# Allegro board SUB_RTL8211_GPHY_V1_0_0427-1542.brd
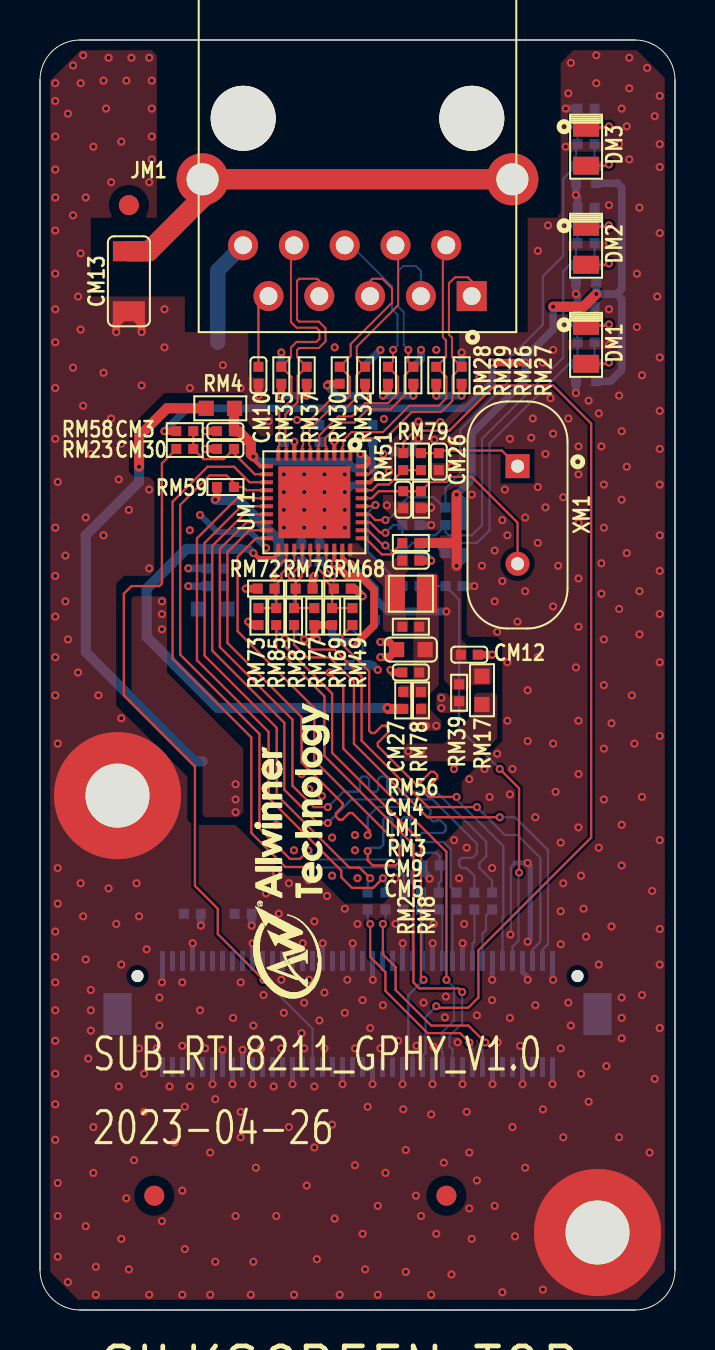
[diagram p0: board, top side]
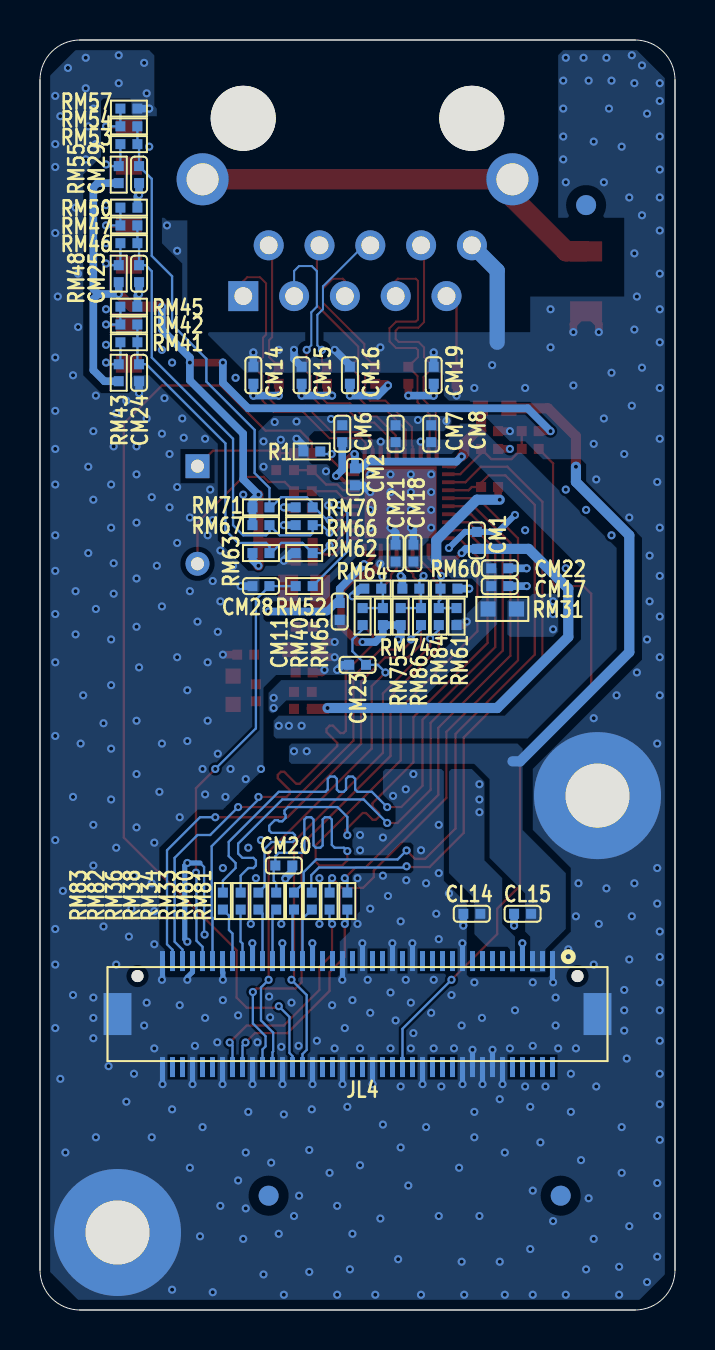
[diagram p1: board, bottom side, seen from below]

Outline 31.75 x 63.5 mm; copper layers: TOP, GND02, GND03, BOTTOM. Coordinates in mm from the lower left corner of the outline.
Outline path: 0,61.5 0,2 ; 0,61.5 arc(0.59,62.91) 2,63.5 ; 0,61.5 0,2 ; 0,2 arc(0.59,0.59) 2,0 ; 2,63.5 29.75,63.5 ; 2,63.5 29.75,63.5 ; 29.75,63.5 arc(31.16,62.91) 31.75,61.5 ; 2,0 29.75,0 ; 2,0 29.75,0 ; 29.75,0 arc(31.16,0.59) 31.75,2 ; 31.75,61.5 31.75,2 ; 31.75,61.5 31.75,2

## Design rules (mm)
net group 8211-XTAL-OUT: nets 8211-XTAL-OUT RGMII-25M
net group CLKOUT-125M: nets CLKOUT-125M RGMII-CLKIN-125M
net group MDC: nets MDC RGMII-MDC
net group MDIO: nets MDIO RGMII-MDIO
net group RGMII-RXCK: nets RGMII-RXCK RXC/PHYAD1
net group RGMII-RXCTL: nets RGMII-RXCTL RXCTL/PHYAD2
net group RGMII-RXD0: nets RGMII-RXD0 RXD0/RXDLY
net group RGMII-RXD1: nets RGMII-RXD1 RXD1/TXDLY
net group RGMII-RXD2: nets RGMII-RXD2 RXD2/PLLOFF
net group RGMII-RXD3: nets RGMII-RXD3 RXD3/PHYAD0
net group RGMII-TXCK: nets RGMII-TXCK TXC
net group RGMII-TXCTL: nets RGMII-TXCTL TXCTL
net group RGMII-TXD0: nets RGMII-TXD0 TXD0
net group RGMII-TXD1: nets RGMII-TXD1 TXD1
net group RGMII-TXD2: nets RGMII-TXD2 TXD2
net group RGMII-TXD3: nets RGMII-TXD3 TXD3
net group AVDD10: nets AVDD10 DVDD10 N15943518
net group DVDD33: nets DVDD33 INTB LED0/CFG-EXT LED1/CFG-LDO0 LED2/CFG-LDO1 N15939570 N15939594 N15939752 RGMII-PHYRSTB RGMII-RST
net group MDI0+: nets MDI0+ MDI0- N15993536

## Placement (name value [footprint] x y rotation side)
CL14  100nF  [C0402]  10.16 19.81 0 bottom
CL15  100nF  [C0402]  7.62 19.81 0 bottom
CM1  104-16V  [C0402]  9.91 38.48 90 bottom
CM2  104-16V  [C0402]  16 41.66 90 bottom
CM3  104-16V  [C0402]  9.27 43.94 0 top
CM4  NC/104-16V  [C0402]  18.54 37.47 180 top
CM5  104-16V  [C0402]  18.54 31.88 0 top
CM6  104-16V  [C0402]  16.64 43.81 90 bottom
CM7  104-16V  [C0402]  13.97 43.81 90 bottom
CM8  104-16V  [C0402]  12.19 43.81 90 bottom
CM9  10uF-16V  [C0603]  18.54 33.02 0 top
CM10  104-16V  [C0402]  10.92 46.74 90 top
CM11  104-16V  [C0402]  16.76 34.92 90 bottom
CM12  104-16V  [C0402]  21.46 32.77 180 top
CM13  1000pF-2KV  [C1206]  4.45 51.44 90 top
CM14  NC/102  [C0402]  21.08 46.74 90 bottom
CM15  NC/102  [C0402]  18.67 46.74 90 bottom
CM16  NC/102  [C0402]  16.26 46.74 90 bottom
CM17  0.1uF-6.3V  [C0402]  8.76 36.2 0 bottom
CM18  4.7uF-6.3V  [C0402]  13.08 37.85 270 bottom
CM19  NC/102  [C0402]  12.06 46.74 90 bottom
CM20  NC/22pF-16V  [C0402]  19.56 22.23 0 bottom
CM21  NC/104-16V  [C0402]  13.97 37.85 270 bottom
CM22  NC/4.7uF-16V  [C0402]  8.76 37.08 0 bottom
CM23  NC/22pF-16V  [C0402]  15.88 32.26 0 bottom
CM24  NC/100pF-16V  [C0402]  26.8 46.86 90 bottom
CM25  NC/100pF-16V  [C0402]  26.8 51.82 90 bottom
CM26  20pF-16V  [C0402]  19.94 42.42 270 top
CM27  20pF-16V  [C0402]  18.16 40.51 270 top
CM28  NC/22pF-16V  [C0402]  20.7 36.2 0 bottom
CM29  NC/100pF-16V  [C0402]  26.8 56.77 90 bottom
CM30  104-16V  [C0402]  9.27 43.05 180 top
DM1  POWER  [LED0805]  27.3 48.26 90 top
DM2  POWER  [LED0805]  27.3 53.21 90 top
DM3  POWER  [LED0805]  27.3 58.17 90 top
H4  NC-HOLE  [MTH635D320]  27.87 3.88 0 top
H14  NC-HOLE  [MTH635D320]  3.88 25.72 0 top
JL4  DF17(2.5)-80DP-0.5V  [SKT2_40P50B570_2500H350]  15.88 14.8 0 bottom
JM1  HFJ11-1G01E  [RJ12P127B1588_2159H1364]  15.88 59.69 180 top
LM1  2.2uH/1A DCR<0.1R  [LP160_200H100]  18.54 35.81 0 top
NOREF  -  [unnamed]  20.32 5.71 0 top
NOREF#2  -  [#2]  84.45 -63.5 0 top
NOREF#3  -  [#2]  -40.64 -80.52 0 top
NOREF#4  -  [#2]  14.86 15.49 90 top
NOREF#5  -  [unnamed]  4.45 55.24 0 top
NOREF#6  -  [unnamed]  5.71 5.71 0 top
NOREF#7  -  [#2]  2 0 90 top
NOREF#8  -  [#2]  0 61.5 0 top
NOREF#9  -  [unnamed]  5.71 5.71 180 bottom
NOREF#10  -  [unnamed]  4.45 55.24 180 bottom
NOREF#11  -  [unnamed]  20.32 5.71 180 bottom
R1  2K49-1%  [R0402]  18.16 42.93 0 bottom
RM2  0R  [R0402]  18.16 30.48 90 top
RM3  NC/0R  [R0402]  18.54 34.16 180 top
RM4  0R  [R0603]  9.02 45.09 180 top
RM8  0R  [R0402]  19.05 30.48 90 top
RM17  0R  [R0603]  22.1 30.99 270 top
RM23  0R  [R0402]  7.24 43.05 180 top
RM26  NC/49R9-1%  [R0402]  19.81 46.74 90 top
RM27  NC/49R9-1%  [R0402]  21.08 46.74 90 top
RM28  NC/49R9-1%  [R0402]  17.4 46.74 90 top
RM29  NC/49R9-1%  [R0402]  18.67 46.74 90 top
RM30  NC/49R9-1%  [R0402]  14.99 46.74 90 top
RM31  0R  [R0603]  8.64 35.05 180 bottom
RM32  NC/49R9-1%  [R0402]  16.26 46.74 90 top
RM33  0R  [R0402]  18.16 20.45 270 bottom
RM34  0R  [R0402]  19.05 20.45 270 bottom
RM35  NC/49R9-1%  [R0402]  12.06 46.74 90 top
RM36  0R  [R0402]  20.83 20.45 270 bottom
RM37  NC/49R9-1%  [R0402]  13.34 46.74 90 top
RM38  0R  [R0402]  19.94 20.45 270 bottom
RM39  NC/0R  [R0402]  20.95 30.86 270 top
RM40  0R  [R0402]  15.62 34.67 270 bottom
RM41  NC/0R  [R0402]  27.3 48.39 180 bottom
RM42  0R  [R0402]  27.3 49.28 180 bottom
RM43  510R  [R0402]  27.81 46.86 90 bottom
RM45  NC/510R  [R0402]  27.3 50.16 180 bottom
RM46  0R  [R0402]  27.3 53.34 180 bottom
RM47  NC/0R  [R0402]  27.3 54.23 180 bottom
RM48  NC/510R  [R0402]  27.81 51.82 90 bottom
RM49  0R  [R0402]  15.62 34.67 270 top
RM50  510R  [R0402]  27.3 55.12 180 bottom
RM51  0R  [R0402]  18.16 42.42 90 top
RM52  0R  [R0402]  18.54 36.2 0 bottom
RM53  NC/0R  [R0402]  27.3 58.29 180 bottom
RM54  0R  [R0402]  27.3 59.18 180 bottom
RM55  510R  [R0402]  27.81 56.77 90 bottom
RM56  4K7  [R0402]  18.54 38.35 0 top
RM57  NC/510R  [R0402]  27.3 60.07 180 bottom
RM58  4K7  [R0402]  7.24 43.94 180 top
RM59  1K5  [R0402]  9.27 41.15 180 top
RM60  NC/4K7  [R0402]  11.3 36.07 180 bottom
RM61  4K7  [R0402]  10.92 34.67 90 bottom
RM62  NC/4K7  [R0402]  18.54 37.85 0 bottom
RM63  4K7  [R0402]  20.7 37.85 180 bottom
RM64  4K7  [R0402]  15.11 36.07 0 bottom
RM65  NC/4K7  [R0402]  14.61 34.67 90 bottom
RM66  4K7  [R0402]  18.54 39.24 0 bottom
RM67  NC/4K7  [R0402]  20.7 39.24 180 bottom
RM68  4K7  [R0402]  15.11 36.07 0 top
RM69  NC/4K7  [R0402]  14.61 34.67 90 top
RM70  4K7  [R0402]  18.54 40.13 0 bottom
RM71  NC/4K7  [R0402]  20.7 40.13 180 bottom
RM72  4K7  [R0402]  11.3 36.07 180 top
RM73  NC/4K7  [R0402]  10.92 34.67 90 top
RM74  4K7  [R0402]  13.21 36.07 0 bottom
RM75  NC/4K7  [R0402]  13.72 34.67 90 bottom
RM76  NC/4K7  [R0402]  13.21 36.07 0 top
RM77  4K7  [R0402]  13.72 34.67 90 top
RM78  0R  [R0402]  19.05 40.51 270 top
RM79  NC/0R  [R0402]  19.05 42.42 90 top
RM80  0R  [R0402]  17.27 20.45 270 bottom
RM81  0R  [R0402]  16.38 20.45 270 bottom
RM82  0R  [R0402]  21.72 20.45 270 bottom
RM83  0R  [R0402]  22.61 20.45 270 bottom
RM84  0R  [R0402]  11.81 34.67 270 bottom
RM85  0R  [R0402]  11.81 34.67 270 top
RM86  0R  [R0402]  12.7 34.67 270 bottom
RM87  0R  [R0402]  12.7 34.67 270 top
UM1  RTL8211F-CG  [QFN41P40B500_500H85]  13.72 40.39 270 top
XM1  25MHZ/49US1  [X2B500_1135H350]  23.88 39.75 270 top

## Library data of the parts
CL14 CL15 = CAPACITOR_0: room: LVDS
CM1 CM6-CM8 CM10 CM20 CM23 CM26-CM28 CM30 = C-C0402: room: EMMC
CM2-CM4 CM11 CM12 CM17 CM18 CM21 CM22 CM24 CM25 CM29 = CAP_2: room: EMAC
CM5 CM9 = CAPACITOR_0
CM13 = C-C1206
CM14-CM16 CM19 = C-C0402: signal model: C-C0402_C0402; room: EMMC
DM1-DM3 = LED-0805
H4 H14 = HOLE
JL4 = DF17-3.0-80DS-0.5V
JM1 = HFJ11-1G01E
LM1 = L-LP2_00X1_60H1_00
R1 RM4 RM17 RM31 RM39 RM59 = R
RM2 RM8 RM23 RM33 RM34 RM36 RM38 RM40 RM42 RM46 RM49 RM51 RM52 RM54 RM78 RM80-RM87 = R-R0402: signal model: R-R0402_6; room: EMMC
RM3 RM41 RM43 RM45 RM47 RM48 RM50 RM53 RM55 RM57 RM79 = R-R0402: room: EMMC
RM26-RM30 RM32 RM35 RM37 = R-R0402: signal model: R-R0402_R0402; room: EMMC
RM56 RM58 RM61 RM63 RM64 RM66 RM68 RM70 RM72 RM74 RM77 = R: signal model: R_R0402_4
RM60 RM62 RM65 RM67 RM69 RM71 RM73 RM75 RM76 = R: signal model: R_R0402_N
UM1 = RTL8169s_1
XM1 = XM/SM_0

## Footprints (pads in the part's own frame, mm; a bottom-side part is the same pattern mirrored in y, then rotated)
C0402
  rect 0.5x0.5 smd: 1(-0.425,0) 2(0.425,0)
C0603
  rect 0.76x0.76 smd: 1(-0.71,0) 2(0.71,0)
C1206
  rect 1x1.6 smd: 1(-1.5,0) 2(1.5,0)
LED0805
  rect 0.9x1.3 smd: 1(-0.95,0) 2(0.95,0)
LP160_200H100
  rect 1x1.9 smd: 1(-0.8,0) 2(0.8,0)
MTH635D320
  round 6.35 hole 3.2: 1(0,0)
QFN41P40B500_500H85
  rect 0.63x0.2 smd: 1(-2.385,1.8) 2(-2.385,1.4) 3(-2.385,1) 4(-2.385,0.6) 5(-2.385,0.2) 6(-2.385,-0.2) 7(-2.385,-0.6) 8(-2.385,-1) 9(-2.385,-1.4) 10(-2.385,-1.8) 21(2.385,-1.8) 22(2.385,-1.4) 23(2.385,-1) 24(2.385,-0.6) 25(2.385,-0.2) 26(2.385,0.2) 27(2.385,0.6) 28(2.385,1) 29(2.385,1.4) 30(2.385,1.8)
  rect 0.2x0.63 smd: 11(-1.8,-2.385) 12(-1.4,-2.385) 13(-1,-2.385) 14(-0.6,-2.385) 15(-0.2,-2.385) 16(0.2,-2.385) 17(0.6,-2.385) 18(1,-2.385) 19(1.4,-2.385) 20(1.8,-2.385) 31(1.8,2.385) 32(1.4,2.385) 33(1,2.385) 34(0.6,2.385) 35(0.2,2.385) 36(-0.2,2.385) 37(-0.6,2.385) 38(-1,2.385) 39(-1.4,2.385) 40(-1.8,2.385)
  rect 3.6x3.6 smd: 41(0,0)
R0402
  rect 0.5x0.5 smd: 1(-0.425,0) 2(0.425,0)
R0603
  rect 0.76x0.76 smd: 1(-0.71,0) 2(0.71,0)
RJ12P127B1588_2159H1364
  round 3.25 hole 3.25 unplated: (-5.715,0.105) (5.715,0.105)
  rect 1.5x1.5 hole 0.89: 1(-5.71,8.995)
  round 1.5 hole 0.89: 2(-4.44,6.455) 3(-3.17,8.995) 4(-1.9,6.455) 5(-0.63,8.995) 6(0.64,6.455) 7(1.91,8.995) 8(3.18,6.455) 9(4.45,8.995) 10(5.72,6.455)
  round 2.6 hole 1.6: 11(-7.745,3.155) 12(7.745,3.155)
SKT2_40P50B570_2500H350
  round 0.6 hole 0.6 unplated: (-11,-1.9) (11,-1.9)
  rect 0.25x1 smd: 1(-9.75,-2.65) 2(-9.75,2.65) 3(-9.25,-2.65) 4(-9.25,2.65) 5(-8.75,-2.65) 6(-8.75,2.65) 7(-8.25,-2.65) 8(-8.25,2.65) 9(-7.75,-2.65) 10(-7.75,2.65) 11(-7.25,-2.65) 12(-7.25,2.65) 13(-6.75,-2.65) 14(-6.75,2.65) 15(-6.25,-2.65) 16(-6.25,2.65) 17(-5.75,-2.65) 18(-5.75,2.65) 19(-5.25,-2.65) 20(-5.25,2.65) 21(-4.75,-2.65) 22(-4.75,2.65) 23(-4.25,-2.65) 24(-4.25,2.65) 25(-3.75,-2.65) 26(-3.75,2.65) 27(-3.25,-2.65) 28(-3.25,2.65) 29(-2.75,-2.65) 30(-2.75,2.65) 31(-2.25,-2.65) 32(-2.25,2.65) 33(-1.75,-2.65) 34(-1.75,2.65) 35(-1.25,-2.65) 36(-1.25,2.65) 37(-0.75,-2.65) 38(-0.75,2.65) 39(-0.25,-2.65) 40(-0.25,2.65) 41(0.25,-2.65) 42(0.25,2.65) 43(0.75,-2.65) 44(0.75,2.65) 45(1.25,-2.65) 46(1.25,2.65) 47(1.75,-2.65) 48(1.75,2.65) 49(2.25,-2.65) 50(2.25,2.65) 51(2.75,-2.65) 52(2.75,2.65) 53(3.25,-2.65) 54(3.25,2.65) 55(3.75,-2.65) 56(3.75,2.65) 57(4.25,-2.65) 58(4.25,2.65) 59(4.75,-2.65) 60(4.75,2.65) 61(5.25,-2.65) 62(5.25,2.65) 63(5.75,-2.65) 64(5.75,2.65) 65(6.25,-2.65) 66(6.25,2.65) 67(6.75,-2.65) 68(6.75,2.65) 69(7.25,-2.65) 70(7.25,2.65) 71(7.75,-2.65) 72(7.75,2.65) 73(8.25,-2.65) 74(8.25,2.65) 75(8.75,-2.65) 76(8.75,2.65) 77(9.25,-2.65) 78(9.25,2.65) 79(9.75,-2.65) 80(9.75,2.65)
  rect 1.4x2.1 smd: 81(12,0) 82(-12,0)
unnamed
  round 1 smd: 1(0,0)
X2B500_1135H350
  rect 1.2x1.2 hole 0.65: 1(-2.44,0)
  round 1.2 hole 0.65: 2(2.44,0)

## Nets
AVDD10: CM6.1 CM7.1 CM8.1 RM8.1 UM1.3(AVDD10 3) UM1.8(AVDD10 8) UM1.38(AVDD10 38)
AVDD33: CM2.2 CM3.2 RM4.1 UM1.11(AVDD33 11) UM1.40(AVDD33 40)
DVDD10: CM1.1 RM2.1 UM1.21(DVDD10 21)
DVDD33: CM11.2 CM12.2 RM17.1 RM39.1 RM43.1 RM48.1 RM55.1 RM56.2 RM58.2 RM63.1 RM67.1 RM71.1 UM1.29(DVDD33 29)
DVDDRG: CM17.2 CM18.2 CM21.2 CM22.2 RM31.1 RM39.2 RM59.2 RM61.1 RM65.1 RM69.1 RM73.1 RM75.1 RM77.1 UM1.28(DVDD_RG)
GND: CL14.2 CL15.2 CM1.2 CM2.1 CM3.1 CM4.1 CM5.1 CM6.2 CM7.2 CM8.2 CM9.1 CM10.1 CM11.1 CM12.1 CM13.1 CM14.2 CM15.2 CM16.2 CM17.1 CM18.1 CM19.2 CM20.1 CM21.1 CM22.1 CM23.2 CM24.1 CM25.1 CM26.2 CM27.2 CM28.2 CM29.1 CM30.2 H4.1 H14.1 JL4.1(P1) JL4.7(P7) JL4.12(P12) JL4.14(P14) JL4.16(P16) JL4.18(P18) JL4.19(P19) JL4.20(P20) JL4.28(P28) JL4.29(P29) JL4.33(P33) JL4.38(P38) JL4.39(P39) JL4.43(P43) JL4.44(P44) JL4.49(P49) JL4.50(P50) JL4.55(P55) JL4.56(P56) JL4.61(P61) JL4.62(P62) JL4.67(P67) JL4.68(P68) JL4.73(P73) JL4.74(P74) JL4.79(P79) JL4.80(P80) JL4.81(GND0) JL4.82(GND1) JM1.10(GND) R1.2 RM45.2 RM50.2 RM57.2 RM60.2 RM62.2 RM64.2 RM66.2 RM68.2 RM70.2 RM72.2 RM74.2 RM76.2 RM78.2 UM1.41(EGND)
VCC-3V3-DEV: CL15.1 JL4.3(P3) JL4.5(P5) RM4.2 RM17.2
VCC-3V3-DEV-IO: CL14.1 JL4.9(P9) RM31.2
8211-XTAL-IN: CM27.1 RM78.1 UM1.36(XTAL_IN) XM1.2
8211-XTAL-OUT: RM51.1 RM79.1 UM1.37(XTAL_OUT/EXT_CLK)
CHASIS-GND: CM13.2 JM1.11(SHIELD-1) JM1.12(SHIELD-0)
CLKOUT-125M: RM52.1 UM1.35(CLKOUT)
INTB: RM56.1 UM1.31(INTB/PMEB)
LED0/CFG-EXT: CM24.2 RM41.2 RM42.2 RM62.1 RM63.2 UM1.32(LED0/CFG_EXT)
LED1/CFG-LDO0: CM25.2 RM46.2 RM47.2 RM66.1 RM67.2 UM1.33(LED1/CFG_LDO0)
LED2/CFG-LDO1: CM29.2 RM53.2 RM54.2 RM70.1 RM71.2 UM1.34(LED2/CFG_LDO1)
MDC: RM33.1 UM1.13(MDC)
MDI0+: JM1.1(TD0+) RM27.2 UM1.1(MDI[0]+)
MDI0-: JM1.2(TD0-) RM26.2 UM1.2(MDI[0]-)
MDI1+: JM1.3(TD1+) RM29.2 UM1.4(MDI[1]+)
MDI1-: JM1.6(TD1-) RM28.2 UM1.5(MDI[1]-)
MDI2+: JM1.4(TD2+) RM32.2 UM1.6(MDI[2]+)
MDI2-: JM1.5(TD2-) RM30.2 UM1.7(MDI[2]-)
MDI3+: JM1.7(TD3+) RM37.2 UM1.9(MDI[3]+)
MDI3-: JM1.8(TD3-) RM35.2 UM1.10(MDI[3]-)
MDIO: RM34.1 RM59.1 UM1.14(MDIO)
REGOUT: CM4.2 LM1.1 RM3.2 UM1.30(REG_OUT)
RGMII-25M: JL4.54(P54) RM51.2
RGMII-CLKIN-125M: CM28.1 JL4.71(P71) RM52.2
RGMII-MDC: JL4.51(P51) RM33.2
RGMII-MDIO: JL4.53(P53) RM34.2
RGMII-PHYRSTB: CM30.1 RM23.1 RM58.1 UM1.12(PHYRSTB)
RGMII-RST: JL4.32(P32) RM23.2
RGMII-RXCK: CM23.1 JL4.58(P58) RM40.2
RGMII-RXCTL: JL4.69(P69) RM49.2
RGMII-RXD0: JL4.77(P77) RM87.2
RGMII-RXD1: JL4.75(P75) RM86.2
RGMII-RXD2: JL4.60(P60) RM85.2
RGMII-RXD3: JL4.52(P52) RM84.2
RGMII-TXCK: JL4.57(P57) RM38.2
RGMII-TXCTL: JL4.59(P59) RM36.2
RGMII-TXD0: JL4.65(P65) RM83.2
RGMII-TXD1: JL4.63(P63) RM82.2
RGMII-TXD2: JL4.64(P64) RM81.2
RGMII-TXD3: JL4.66(P66) RM80.2
RSET: R1.1 UM1.39(RSET)
RXC/PHYAD1: RM40.1 RM64.1 RM65.2 UM1.27(RXC/PHYAD1)
RXCTL/PHYAD2: RM49.1 RM68.1 RM69.2 UM1.26(RXCTL/PHYAD2)
RXD0/RXDLY: RM76.1 RM77.2 RM87.1 UM1.25(RXD0/RXDLY)
RXD1/TXDLY: RM74.1 RM75.2 RM86.1 UM1.24(RXD1/TXDLY)
RXD2/PLLOFF: RM72.1 RM73.2 RM85.1 UM1.23(RXD2/PLLOFF)
RXD3/PHYAD0: RM60.1 RM61.2 RM84.1 UM1.22(RXD3/PHYAD0)
TXC: CM20.2 RM38.1 UM1.20(TXC)
TXCTL: RM36.1 UM1.19(TXCTL)
TXD0: RM83.1 UM1.18(TXD0)
TXD1: RM82.1 UM1.17(TXD1)
TXD2: RM81.1 UM1.16(TXD2)
TXD3: RM80.1 UM1.15(TXD3)
XTAL-OUT: CM26.1 RM79.2 XM1.1
N15939562: DM1.1(ANODE) RM41.1 RM43.2
N15939566: DM3.1(ANODE) RM53.1 RM55.2
N15939570: DM2.1(ANODE) RM46.1 RM48.2
N15939594: DM1.2(CATHODE) RM42.1 RM45.1
N15939682: DM2.2(CATHODE) RM47.1 RM50.1
N15939752: DM3.2(CATHODE) RM54.1 RM57.1
N15943518: CM5.2 CM9.2 LM1.2 RM2.2 RM3.1 RM8.2
N15990976: CM10.2 JM1.9(VCC)
N15993536: CM14.1 RM26.1 RM27.1
N15993596: CM15.1 RM28.1 RM29.1
N15993624: CM16.1 RM30.1 RM32.1
N15993644: CM19.1 RM35.1 RM37.1

Pads without a net: JL4 2 4 6 8 10 11 13 15 17 21 22 23 24 25 26 27 30 31 34 35 36 37 40 41 42 45 46 47 48 70 72 76 78; NOREF 1; NOREF#5 1; NOREF#6 1; NOREF#9 1; NOREF#10 1; NOREF#11 1

## Via types
v1: diameter 0.406, hole 0.203, TOP to BOTTOM, 553 vias

## Routing (per net, layer and track width the routed paths; a pad name or vN(x,y) marks a point on that pad's centre or on a via; arc(x,y) is an arc through that point)
AVDD10: length 4.1
  TOP w0.203: v1(16.94,41.71) 16.81,41.71 16.49,41.39 UM1.38 ; UM1.3 v1(14.72,43.42) ; UM1.8 v1(12.72,43.42)
  BOTTOM w0.381: CM6.1 16.64,42.01 v1(16.94,41.71)
  vias: v1(18.67,29.21) v1(19.3,29.21) v1(19.81,29.21)
AVDD33: length 11.3
  TOP w0.203: v1(10.67,42.67) 10.67,42.54 11.03,42.19 UM1.11 ; UM1.40 16.28,42.19 16.43,42.34 16.43,42.55 16.18,42.8 v1(16.03,42.8)
  TOP w0.508: RM4.1 9.7,45.05 CM3.2 9.93,43.94 10.54,43.33 10.54,42.8 v1(10.67,42.67)
  BOTTOM w0.381: v1(16.03,42.8) 16,42.77 CM2.2 15.7,42.08 15.37,42.42 10.93,42.42 10.67,42.67 v1(10.67,42.67)
DVDD10: length 24.6
  TOP w0.203: UM1.21 11.92,37.82 11.69,37.6 10.92,37.6 v1(10.67,37.85)
  TOP w0.508: v1(17.37,30.1) 17.42,30.06 RM2.1
  BOTTOM w0.381: CM1.1 10.46,38.06 v1(10.67,37.85)
  BOTTOM w0.508: CM1.1 7.32,38.06 5.33,36.07 5.33,33.66 8.89,30.1 v1(17.37,30.1)
DVDD33: length 63.2
  TOP w0.203: UM1.29 15.12,37.64 15.47,37.29 v1(15.54,37.29)
  TOP w0.381: v1(22.61,47.37) v1(24.26,47.37) ; RM58.2 v1(6.22,43.94)
  TOP w0.508: v1(27.81,50.8) 27.18,50.16 v1(25.65,50.16) ; v1(20.83,37.21) 20.83,38.35 ; 20.83,38.35 RM56.2 ; 20.83,38.35 v1(20.83,40.77)
  BOTTOM w0.381: RM63.1 21.13,37.51 v1(20.83,37.21) ; RM43.1 28.53,46.44 29.08,46.99 29.08,50.55 28.83,50.8 ; 28.83,50.8 v1(27.81,50.8) RM48.1 ; 28.83,50.8 29.08,51.05 29.08,56.13 28.87,56.34 RM55.1 ; v1(20.32,34.92) 17.4,34.92 16.97,35.35 CM11.2 16.76,36.07 v1(15.54,37.29) ; v1(22.61,47.37) 22.61,46.35 21.34,45.09 7.37,45.09 v1(6.22,43.94) ; v1(25.65,50.16) 25.65,49.02 24.26,47.62 v1(24.26,47.37) 24.26,46.48 21.59,43.81 21.59,41.53 v1(20.83,40.77) 21.13,40.47 RM71.1 RM67.1
DVDDRG: length 17.7
  TOP w0.203: UM1.28 14.72,37.33 v1(14.73,37.31)
  TOP w0.381: v1(13.84,33.53) 13.72,33.66 RM77.1 RM69.1 ; RM59.2 8.85,40.6 v1(8.76,40.51) ; v1(15.62,33.4) 15.88,33.4 16.7,34.23 16.7,36.01 16.01,36.71 15.34,36.71 v1(14.73,37.31) ; v1(10.41,34.42) 10.58,34.25 RM73.1
  BOTTOM w0.381: v1(13.84,33.53) 13.72,33.66 RM77.1 RM69.1 14.61,33.78 14.99,33.4 v1(15.62,33.4)
  BOTTOM w0.508: v1(8.76,40.51) 9.91,40.51 11.94,38.48 11.94,37.39
  vias: v1(20.07,30.61) v1(20.07,30.1)
GND: length 72.5
  TOP w0.381: v1(13.72,36.7) 13.63,36.62 RM76.2 ; v1(10.29,36.07) RM72.2 ; CM10.1 v1(10.92,45.72) ; RM68.2 15.75,36.07 v1(16.13,35.69) ; v1(17.53,32) 17.65,31.88 CM5.1 ; CM3.1 v1(8.26,43.94) ; RM78.2 19.51,40.09 v1(19.56,40.13) ; CM4.1 v1(19.56,37.47) ; CM30.2 v1(8.26,43.05) ; v1(5.08,48.9) 5.08,49.3 CM13.1 3.81,49.3 v1(3.81,48.9) ; v1(17.02,32.64) 17.45,32.64 CM9.1 17.45,33.4 v1(17.02,33.4) ; CM12.1 v1(22.61,32.77)
  BOTTOM w0.114: v1(23.52,18.77) 23.52,18.82 23.55,18.85 23.55,22.15 23.75,22.35
  BOTTOM w0.254: JL4.19 10.63,18.33 v1(10.63,18.34) ; JL4.73 24.12,16.9 24.38,16.64 v1(24.38,16.51) ; JL4.56 v1(19.63,11.29) ; v1(6.1,16.38) 6.12,16.41 JL4.1 ; v1(16.64,16.51) 16.63,16.52 JL4.43 ; JL4.55 19.63,18.33 v1(19.63,18.34) ; JL4.74 v1(24.12,11.29) ; JL4.49 18.12,18.33 v1(18.13,18.34) ; JL4.16 v1(9.63,11.29) ; JL4.14 v1(9.12,13.01) ; JL4.44 v1(16.63,11.29) ; JL4.18 v1(10.12,13.01) ; v1(25.65,16.51) 25.63,16.54 JL4.79 ; v1(24.38,18.41) 24.51,18.54 24.51,22.23 v1(24.38,22.35) 23.75,22.35 ; JL4.29 13.12,18.33 v1(13.13,18.34) ; JL4.20 v1(10.63,11.29) ; v1(15.63,18.34) 15.63,18.33 JL4.39 ; JL4.7 7.63,18.33 v1(7.63,18.34) ; JL4.28 v1(12.63,11.29) ; JL4.80 v1(25.63,11.29) ; JL4.38 v1(15.12,11.29) ; JL4.50 v1(18.12,11.29) ; JL4.33 14.12,18.33 v1(14.13,18.34) ; JL4.62 v1(21.12,11.29) ; JL4.61 21.12,18.33 v1(21.13,18.34) ; JL4.68 v1(22.63,11.29) ; v1(22.61,16.51) 22.61,16.87 22.63,16.89 JL4.67 ; JL4.12 v1(8.63,11.29)
  BOTTOM w0.305: v1(11.3,38.1) 10.5,38.91 CM1.2 8.85,38.91 v1(8,39.75)
  BOTTOM w0.381: RM50.2 26.88,55.67 v1(26.8,55.75) CM29.1 ; RM76.2 13.63,36.62 v1(13.72,36.7) ; v1(18.92,43.56) 18.59,43.22 R1.2 ; v1(19.56,37.47) 19.18,37.85 RM62.2 ; CL14.2 v1(10.58,19.22) ; CM18.1 13.08,38.99 v1(13.21,39.12) ; CM15.2 18.67,47.16 19.05,47.54 v1(19.05,48.01) ; RM70.2 v1(19.56,40.13) ; v1(10.29,36.07) RM72.2 ; CM23.2 16.64,32.26 v1(16.89,32) ; RM45.2 26.88,50.72 v1(26.8,50.8) CM25.1 ; CM20.1 19.13,21.94 19.48,21.59 v1(19.48,21.56) ; v1(15.24,40.89) 15.58,41.23 CM2.1 ; CM19.2 v1(12.06,47.88) ; RM68.2 15.75,36.07 v1(16.13,35.69) ; CM28.2 v1(21.72,36.2) ; CM22.1 v1(7.42,37.08) ; CM24.1 v1(26.8,45.85) ; v1(17.02,48.01) 16.26,47.24 CM16.2 ; CM21.1 13.97,38.86 v1(14.22,39.12) ; RM66.2 v1(19.56,39.24) ; CM17.1 v1(7.42,36.2) ; CM14.2 v1(21.08,47.88) ; RM57.2 v1(26.29,60.07) ; CL15.2 v1(8.04,19.22)
  BOTTOM w0.762: JM1.10 8.89,51.97 8.89,48.39
  vias: v1(0.76,61.34) v1(0.76,60.45) v1(0.76,58.67) v1(0.76,57.02) v1(0.76,55.63) v1(0.76,53.98) v1(0.76,51.82) v1(0.76,50.04) v1(0.76,48.39) v1(0.76,46.1) v1(0.76,43.56) v1(0.76,39.12) v1(0.76,36.7) v1(0.76,34.67) v1(0.76,32.64) v1(0.76,30.73) v1(0.76,18.92) v1(0.76,17.65) v1(0.76,16.38) v1(0.76,14.99) v1(0.76,13.46) v1(0.76,11.81) v1(0.76,10.29) v1(0.76,8.51) v1(0.89,41.4) v1(0.89,28.32) v1(0.89,22.1) v1(0.89,20.32) v1(0.89,6.35) v1(0.89,4.7) v1(0.89,2.67) v1(1.27,37.72) v1(1.27,35.43) v1(1.4,59.82) v1(1.4,33.53) v1(1.4,1.4) v1(1.65,62.23) v1(1.65,54.74) v1(1.65,47.12) v1(1.91,50.67) v1(1.91,31.88) v1(2.03,61.34) v1(2.03,52.83) v1(2.03,49.02) v1(2.03,21.34) v1(2.16,62.74) v1(2.16,45.21) v1(2.16,19.68) v1(2.29,55.63) v1(2.29,39.62) v1(2.29,17.53) v1(2.29,4.19) v1(2.41,12.57) v1(2.54,42.8) v1(2.54,16) v1(2.54,14.99) v1(2.54,13.97) v1(2.67,58.17) v1(2.67,9.14) v1(2.67,6.86) v1(2.79,2.16) v1(2.79,0.76) v1(2.92,30.73) v1(3.17,61.47) v1(3.17,46.86) v1(3.17,38.73) v1(3.3,60.07) v1(3.43,62.61) v1(3.43,21.08) v1(3.56,56.39) v1(3.56,44.58) v1(3.81,19.3) v1(3.94,41.53) v1(3.94,11.18) v1(4.06,58.42) v1(4.06,43.31) v1(4.06,29.59) v1(4.06,17.27) v1(4.06,3.56) v1(4.32,61.47) v1(4.32,5.59) v1(4.45,40.01) v1(4.45,2.03) v1(4.57,62.61) v1(4.7,7.49) v1(4.83,21.34) v1(4.95,19.68) v1(4.95,13.08) v1(5.08,46.23) v1(5.21,11.81) v1(5.21,9.91) v1(5.33,18.03) v1(5.46,62.61) v1(5.46,56.39) v1(5.46,41.02) v1(5.46,37.08) v1(5.46,0.76) v1(5.59,61.47) v1(5.59,60.07) v1(5.59,58.67) v1(5.59,57.53) v1(5.84,13.08) v1(5.97,15.62) v1(5.97,14.22) v1(6.1,4.45) v1(6.22,50.04) v1(6.22,48.13) v1(6.48,11.18) v1(6.73,8.38) v1(7.11,16.38) v1(7.11,13.21) v1(7.11,5.97) v1(7.11,0.76) v1(7.24,10.16) v1(7.24,3.05) v1(7.49,46.1) v1(7.49,38.99) v1(7.49,11.18) v1(8,14.99) v1(8.26,13.08) v1(8.51,7.87) v1(8.51,0.76) v1(8.76,10.54) v1(8.76,2.41) v1(9.14,47.24) v1(9.65,14.61) v1(9.78,4.7) v1(10.03,46.1) v1(10.03,16.38) v1(10.03,9.91) v1(10.03,8.64) v1(10.54,0.76) v1(10.67,14.22) v1(10.67,2.41) v1(10.79,7.11) v1(11.05,13.08) v1(11.18,15.75) v1(11.3,20.83) v1(11.43,44.45) v1(11.68,11.18) v1(11.81,24.26) v1(11.81,21.84) v1(11.81,18.54) v1(11.81,4.7) v1(11.94,19.81) v1(12.06,16.51) v1(12.06,13.08) v1(12.19,41.78) v1(12.19,40.89) v1(12.19,40.01) v1(12.19,39.12) v1(12.19,14.86) v1(12.45,21.34) v1(12.45,9.14) v1(12.7,22.99) v1(12.7,0.76) v1(12.85,44.5) v1(13.08,26.8) v1(13.08,13.84) v1(13.21,41.78) v1(13.21,40.89) v1(13.21,40.01) v1(13.21,15.37) v1(13.21,13.08) v1(13.34,6.22) v1(13.44,21.49) v1(13.46,26.04) v1(13.46,16.51) v1(13.72,19.43) v1(13.72,11.18) v1(13.72,8.13) v1(13.84,2.54) v1(13.97,14.48) v1(14.1,25.7) v1(14.22,41.78) v1(14.22,40.89) v1(14.22,40.01) v1(14.22,15.88) v1(14.22,13.08) v1(14.35,20.7) v1(14.61,23.62) v1(14.61,21.72) v1(14.61,9.27) v1(14.73,48.13) v1(14.73,4.57) v1(14.99,0.76) v1(15.24,41.78) v1(15.24,40.01) v1(15.24,39.12) v1(15.24,20.07) v1(15.24,14.86) v1(15.37,16.51) v1(15.75,23.75) v1(15.75,22.99) v1(15.75,13.08) v1(15.75,7.24) v1(15.88,21.59) v1(15.88,19.3) v1(16.13,15.49) v1(16.13,3.81) v1(16.26,2.03) v1(16.38,10.16) v1(16.51,14.1) v1(16.89,5.21) v1(16.89,0.76) v1(17.02,13.08) v1(17.14,15.24) v1(17.2,44.55) v1(17.34,40.23) v1(17.27,6.86) v1(17.45,41.94) v1(17.78,21.59) v1(17.78,19.3) v1(17.91,13.46) v1(18.16,10.03) v1(18.29,8) v1(18.29,1.91) v1(18.82,13.21) v1(18.8,5.71) v1(18.92,44.42) v1(19.05,4.7) v1(19.18,15.37) v1(19.56,9.78) v1(19.56,0.76) v1(19.71,43.51) v1(19.68,19.3) v1(19.68,13.16) v1(19.81,48.01) v1(19.81,3.81) v1(20.02,44.4) v1(20.24,14.63) v1(20.19,7.37) v1(20.29,15.67) v1(20.57,43.43) v1(20.57,42.16) v1(20.57,1.78) v1(20.7,27.05) v1(20.7,23.5) v1(20.88,13.39) v1(20.95,21.59) v1(21.21,19.3) v1(21.34,23.11) v1(21.34,9.91) v1(21.46,26.54) v1(21.46,7.87) v1(21.46,5.08) v1(21.59,40.77) v1(21.59,3.56) v1(21.84,14.73) v1(21.84,6.48) v1(21.97,46.61) v1(22.1,37.21) v1(22.23,27.05) v1(22.48,25.65) v1(22.61,22.1) v1(22.61,15.49) v1(22.73,37.97) v1(22.73,35.43) v1(22.73,5.21) v1(22.86,33.91) v1(22.86,27.81) v1(22.89,13.39) v1(23.11,39.5) v1(23.11,36.45) v1(23.11,0.89) v1(23.24,41.02) v1(23.37,38.73) v1(23.37,32.38) v1(23.37,29.46) v1(23.5,43.56) v1(23.5,25.78) v1(23.5,14.61) v1(23.62,27.05) v1(23.62,9.14) v1(23.75,3.68) v1(23.88,34.42) v1(24,13.21) v1(24.26,39.62) v1(24.26,35.94) v1(24.26,7.11) v1(24.38,30.99) v1(24.38,28.45) v1(24.64,44.58) v1(24.56,43.61) v1(24.77,24.64) v1(24.77,15.24) v1(24.89,52.96) v1(24.89,41.15) v1(24.89,38.35) v1(24.89,32.64) v1(25.15,47.37) v1(25.15,10.03) v1(25.15,1.02) v1(25.27,42.8) v1(25.27,40.13) v1(25.4,54.23) v1(25.53,45.59) v1(25.65,48.01) v1(25.65,43.81) v1(25.65,35.18) v1(25.65,28.32) v1(25.78,25.91) v1(25.91,37.21) v1(26.04,23.37) v1(26.04,19.94) v1(26.04,18.29) v1(26.04,13.08) v1(26.16,40.64) v1(26.16,21.34) v1(26.16,8.64) v1(26.29,58.17) v1(26.42,60.83) v1(26.42,44.58) v1(26.42,15.37) v1(26.54,62.36) v1(26.54,14.22) v1(26.8,32.13) v1(26.92,43.18) v1(26.92,41.78) v1(26.92,39.37) v1(26.92,36.58) v1(26.92,34.16) v1(26.92,29.46) v1(26.92,26.8) v1(26.92,24.13) v1(27.05,21.72) v1(27.05,11.81) v1(27.18,20.07) v1(27.3,18.67) v1(27.43,45.47) v1(27.43,10.41) v1(27.81,62.74) v1(27.81,61.34) v1(27.94,44.83) v1(27.94,23.11) v1(27.94,17.27) v1(28.07,43.18) v1(28.07,37.34) v1(28.07,35.81) v1(28.19,41.27) v1(28.19,39.12) v1(28.19,33.53) v1(28.19,31.24) v1(28.19,28.07) v1(28.19,25.53) v1(28.32,12.19) v1(28.45,55.24) v1(28.45,53.34) v1(28.45,50.04) v1(28.45,48.26) v1(28.57,29.34) v1(28.57,19.18) v1(28.96,58.29) v1(28.96,45.72) v1(28.96,35.05) v1(28.96,8.64) v1(29.08,60.07) v1(29.08,43.94) v1(29.08,40.51) v1(29.08,24.26) v1(29.08,22.23) v1(29.08,15.62) v1(29.08,14.61) v1(29.08,13.59) v1(29.34,59.18) v1(29.34,42.16) v1(29.34,37.85) v1(29.46,62.61) v1(29.46,61.09) v1(29.46,57.53) v1(29.59,30.73) v1(29.72,28.32) v1(29.84,51.82) v1(29.84,49.15) v1(29.97,55.12) v1(29.97,35.94) v1(29.97,33.78) v1(30.1,46.74) v1(30.1,25.65) v1(30.1,15.75) v1(30.35,62.1) v1(30.48,7.87) v1(30.61,20.95) v1(30.73,59.69) v1(30.73,11.56) v1(30.86,50.67) v1(30.99,60.71) v1(30.99,58.29) v1(30.99,57.15) v1(30.99,53.85) v1(30.99,47.62) v1(30.99,44.96) v1(30.99,43.05) v1(30.99,41.27) v1(30.99,38.73) v1(30.99,36.96) v1(30.99,34.8) v1(30.99,32.38) v1(30.99,28.7) v1(30.99,23.5) v1(30.99,19.05) v1(30.99,17.27) v1(30.99,14.1)
VCC-3V3-DEV: length 23.9
  TOP w0.508: v1(4.95,42.16) 4.95,43.69 6.35,45.09 RM4.2
  BOTTOM w0.508: v1(4.95,42.16) 4.95,41.4 2.29,38.73 2.29,32.89 7.75,27.43 8.13,27.43
  vias: v1(18.41,27.94) v1(19.05,27.94)
VCC-3V3-DEV-IO:
  vias: v1(6.1,35.43) v1(6.1,34.8) v1(6.1,34.04) v1(9.78,26.29) v1(9.78,25.53) v1(9.78,24.89)
8211-XTAL-IN: length 11.2
  TOP w0.114: XM1.2 23.88,39.37 21.59,41.66 20.57,41.66 20.32,41.4 19.51,41.4 RM78.1 CM27.1 16.93,40.94 16.58,40.59 UM1.36
8211-XTAL-OUT: length 3.4
  TOP w0.114: UM1.37 16.6,40.99 16.89,41.27 17.44,41.27 RM51.1 RM79.1
CHASIS-GND: length 21.2
  TOP w1.016: CM13.2 5.44,52.94 8.13,55.63 JM1.12 JM1.11
CLKOUT-125M: length 5.6
  TOP w0.114: v1(16.77,40.25) 16.75,40.25 16.69,40.19 UM1.35
  BOTTOM w0.114: v1(16.77,40.25) 16.38,39.86 16.38,37.93 RM52.1
INTB: length 2.6
  TOP w0.114: UM1.31 16.28,38.59 17.09,37.78 17.52,37.78 17.59,37.85 17.61,37.85 RM56.1
LED0/CFG-EXT: length 20.3
  TOP w0.114: UM1.32 16.4,38.99 17.16,38.23 v1(17.27,38.23)
  BOTTOM w0.114: v1(17.27,38.23) 17.65,37.85 RM62.1 18.63,38.35 19.68,38.35 20.19,37.85 RM63.2 20.28,38.18 20.45,38.35 21.84,38.35 22.48,38.99 22.48,43.33 26.43,47.29 CM24.2 26.88,47.37 RM41.2 RM42.2
LED1/CFG-LDO0: length 24.8
  TOP w0.114: UM1.33 16.49,39.39 17.02,38.86 v1(17.27,38.86)
  BOTTOM w0.114: RM47.2 RM46.2 26.8,53.26 CM25.2 26.46,52.24 26.16,51.94 26.16,47.63 22.1,43.56 22.1,39.24 21.59,38.73 20.45,38.73 20.28,38.91 RM67.2 19.77,38.73 18.23,38.73 18.12,38.85 RM66.1 17.67,39.24 17.55,39.13 17.54,39.13 v1(17.27,38.86)
LED2/CFG-LDO1: length 26.9
  TOP w0.114: v1(17.27,39.5) 16.76,39.5 16.47,39.79 UM1.34
  BOTTOM w0.114: RM54.2 RM53.2 26.8,58.21 CM29.2 26.16,56.56 26.16,52.7 25.15,51.69 25.15,49.28 23.43,47.56 23.43,46.42 21.02,44.01 21.02,41.85 20.28,41.1 RM71.2 20.19,40.13 19.68,40.64 18.41,40.64 18.12,40.34 RM70.1 18.03,40.13 17.4,39.5 v1(17.27,39.5)
MDC: length 33.3
  TOP w0.114: v1(13.42,22.18) 13.39,22.15 12.27,22.15 10.57,23.85 10.57,28.63 6.63,32.56 6.63,40.41 8.38,42.16 9.7,42.16 10.48,41.39 UM1.13
  BOTTOM w0.114: v1(13.42,22.18) 13.48,22.12 17.81,22.12 18.19,21.74 18.19,20.9 RM33.1
MDI0+: length 15
  TOP w0.102: UM1.1 15.52,43.16 15.47,43.21 15.47,43.36 15.7,43.59 17.27,43.59 18.59,44.91 20.07,44.91 20.62,45.47 20.62,46.7 RM27.2 20.6,47.64 20.6,48.62 20.45,48.77 20.45,51.33 20.75,51.64 21.39,51.64 21.58,51.44 JM1.1
MDI0-: length 14.9
  TOP w0.102: UM1.2 15.12,43.16 15.16,43.21 15.16,43.48 15.57,43.89 17.15,43.89 18.47,45.21 19.94,45.21 20.32,45.59 20.32,46.65 RM26.2 20.29,47.64 20.29,48.49 20.14,48.64 20.14,53.06 JM1.2
MDI1+: length 15
  TOP w0.102: v1(18.41,48.01) 18.41,47.41 RM29.2 18.21,46.7 18.21,45.72 17.53,45.03 16.38,45.03 15.72,44.37 15.04,44.37 14.27,43.61 14.27,43.21 14.32,43.16 UM1.4
  BOTTOM w0.102: JM1.3 19.04,51.95 18.8,52.2 18.16,52.2 17.91,51.94 17.91,50.16 18.19,49.89 18.19,48.23 v1(18.41,48.01)
MDI1-: length 14.9
  TOP w0.102: v1(17.65,48.01) 17.65,47.41 RM28.2 17.91,46.65 17.91,45.85 17.4,45.34 16.26,45.34 15.6,44.68 14.91,44.68 13.96,43.73 13.96,43.27 13.92,43.23 UM1.5
  BOTTOM w0.102: JM1.6 15.55,53.24 17.6,51.18 17.6,50.04 17.88,49.76 17.88,48.23 v1(17.65,48.01)
MDI2+: length 13.2
  TOP w0.102: JM1.4 17.91,53.1 17.91,50.24 15.84,48.17 15.84,47.58 RM32.2 15.8,46.7 15.8,45.59 15.37,45.16 14.6,45.16 13.46,44.02 13.46,43.23 13.52,43.18 UM1.6
MDI2-: length 13.1
  TOP w0.102: UM1.7 13.12,43.19 13.16,43.23 13.16,44.15 14.48,45.47 15.24,45.47 15.49,45.72 15.49,46.65 RM30.2 15.53,47.71 15.53,48.3 17.6,50.37 17.6,51.08 17.12,51.56 16.61,51.56 16.5,51.45 JM1.5
MDI3+: length 13.7
  TOP w0.102: JM1.7 13.96,51.46 13.86,51.56 12.95,51.56 12.85,51.46 12.85,49.52 12.95,49.42 13.94,49.42 14.27,49.09 14.27,48.43 13.94,48.1 12.95,48.1 12.85,48 12.85,47.64 RM37.2 12.88,46.7 12.88,45.39 12.27,44.78 12.27,43.23 12.32,43.18 UM1.9
MDI3-: length 13.5
  TOP w0.102: UM1.10 11.92,43.16 11.96,43.21 11.96,44.91 12.57,45.52 12.57,46.65 RM35.2 12.55,47.64 12.55,48.12 12.83,48.4 13.82,48.4 13.97,48.56 13.97,48.96 13.82,49.12 12.83,49.12 12.55,49.4 12.55,53.09 JM1.8
MDIO: length 33.3
  TOP w0.114: v1(13.42,22.98) 13,22.56 12.5,22.56 10.97,24.08 10.97,28.8 7.01,32.77 7.01,40.26 8.48,41.73 9.32,41.73 9.7,41.36 RM59.1 10.16,41.15 10.32,40.99 UM1.14
  BOTTOM w0.114: v1(13.42,22.98) 13.87,22.53 17.93,22.53 18.57,21.89 18.57,21.35 RM34.1
RGMII-25M: length 48.6
  TOP w0.114: RM51.2 18.16,43.38 18.75,43.97 20.47,43.97 22.73,46.23 25.65,46.23 27.56,44.32 27.56,23.62 21.92,17.98 21.92,15.62 21.41,15.11 19.89,15.11 v1(19.81,15.19)
  BOTTOM w0.114: v1(19.81,15.19) 19.28,14.66 19.28,12.85 19.12,12.7 JL4.54
RGMII-CLKIN-125M: length 21.7
  TOP w0.114: v1(23.95,21.87) 23.95,26.09 v1(22.99,27.05)
  BOTTOM w0.114: v1(22.99,27.05) 20.95,29.08 20.95,35.52 CM28.1 RM52.2 ; v1(23.95,21.87) 23.93,21.84 23.93,18.47 23.62,18.16 23.62,17.45 JL4.71
RGMII-MDC: length 2.8
  BOTTOM w0.114: RM33.2 18.63,19.56 JL4.51
RGMII-MDIO: length 2.6
  BOTTOM w0.114: JL4.53 19.12,19.95 RM34.2
RGMII-PHYRSTB: length 5.6
  TOP w0.114: RM58.1 RM23.1 8.17,42.55 9.19,42.55 CM30.1 9.7,42.83 10.74,41.79 UM1.12
RGMII-RST: length 36.7
  TOP w0.114: RM23.2 6.1,42.33 6.1,36.32 5.97,36.2 4.57,36.2 4.19,35.81 4.19,30.73 7.75,27.18 7.75,21.21 8.89,20.07 8.89,18.8 v1(11.18,16.51)
  BOTTOM w0.114: v1(11.18,16.51) 13.63,14.06 JL4.32
RGMII-RXCK: length 26.2
  TOP w0.114: v1(14.48,31.88) 15.16,31.19 15.16,28.07 20.32,22.91 v1(20.32,16.51)
  BOTTOM w0.114: RM40.2 15.62,34.04 16.13,33.53 16.13,32.94 CM23.1 14.86,32.26 v1(14.48,31.88) ; JL4.58 20.12,12.89 20.09,12.93 20.09,13.87 20.7,14.48 20.7,16.13 v1(20.32,16.51)
RGMII-RXCTL: length 24.4
  TOP w0.114: v1(20.83,25.65) 19.43,25.65 19.26,25.83 19.26,25.99 19.86,26.59 19.86,26.75 19.7,26.91 19.54,26.91 18.94,26.31 18.77,26.31 16.89,28.2 16.89,28.36 17.43,28.89 17.43,29.06 17.26,29.22 17.1,29.22 16.73,28.85 16.57,28.85 16.46,28.96 16.46,31.93 15.11,33.27 15.11,33.74 RM49.2
  BOTTOM w0.114: v1(20.83,25.65) 20.83,25.53 23.17,23.19 23.17,19.64 23.12,19.6 JL4.69
RGMII-RXD0: length 25.4
  TOP w0.114: RM87.2 12.7,33.27 13.35,32.63 14.49,32.63 15.7,31.42 15.7,28.31 19.37,24.64 v1(22.99,24.64)
  BOTTOM w0.114: JL4.77 25.12,18.01 25.4,18.29 25.4,22.99 23.75,24.64 v1(22.99,24.64)
RGMII-RXD1: length 24.5
  TOP w0.114: v1(21.84,25.15) 19.4,25.15 16.08,28.47 16.08,31.67 14.73,33.02 13.59,33.02 13.21,33.4 v1(13.21,33.53)
  BOTTOM w0.114: v1(13.21,33.53) 12.7,34.04 RM86.2 ; v1(21.84,25.15) 23.24,23.75 23.88,23.75 25.02,22.61 25.02,18.41 24.63,18.02 JL4.75
RGMII-RXD2: length 27.4
  TOP w0.114: RM85.2 11.81,33.1 14.22,30.68 14.22,27.7 18.67,23.26 18.67,16.38 18.97,16.08 20.93,16.08 v1(21.11,15.9)
  BOTTOM w0.114: JL4.60 20.63,13.03 20.47,13.18 20.47,13.69 21.11,14.33 v1(21.11,15.9)
RGMII-RXD3: length 25.6
  TOP w0.114: v1(19.18,16.51) 19.05,16.64 19.05,23.41 14.61,27.86 14.61,30.82 12.24,33.19 v1(12.24,33.58)
  BOTTOM w0.114: JL4.52 18.63,12.79 18.41,13 18.41,15.75 v1(19.18,16.51) ; RM84.2 11.81,34.01 v1(12.24,33.58)
RGMII-TXCK: length 2.7
  BOTTOM w0.114: JL4.57 20.12,19.84 RM38.2
RGMII-TXCTL: length 2.7
  BOTTOM w0.114: RM36.2 20.63,19.82 JL4.59
RGMII-TXD0: length 2.8
  BOTTOM w0.114: RM83.2 22.3,19.72 22.3,19 22.12,18.82 JL4.65
RGMII-TXD1: length 2.6
  BOTTOM w0.114: RM82.2 21.72,20.02 21.72,18.42 21.63,18.32 JL4.63
RGMII-TXD2: length 11
  TOP w0.114: v1(21.47,13.38) 21.01,13.84 19.38,13.84 17.27,15.95 17.27,16.89 16.51,17.65 v1(16.51,19.3)
  BOTTOM w0.114: RM81.2 16.38,19.43 v1(16.51,19.3) ; v1(21.47,13.38) 21.63,13.22 JL4.64
RGMII-TXD3: length 11.2
  TOP w0.114: v1(17.14,19.3) 17.14,17.78 17.78,17.14 17.78,16 19.56,14.22 21.42,14.22 v1(22.27,13.38)
  BOTTOM w0.114: v1(17.14,19.3) 17.27,19.43 RM80.2 ; v1(22.27,13.38) 22.12,13.23 JL4.66
RSET: length 2.3
  TOP w0.114: v1(17.17,42.8) 17.17,42.52 16.44,41.79 UM1.39
  BOTTOM w0.114: v1(17.17,42.8) 17.61,42.8 R1.1
RXC/PHYAD1: length 4.1
  TOP w0.114: v1(14.63,36.68) 14.63,36.7 14.32,37.02 UM1.27
  BOTTOM w0.114: RM40.1 RM65.2 14.61,35.98 RM64.1 14.69,36.62 v1(14.63,36.68)
RXCTL/PHYAD2: length 4.3
  TOP w0.114: UM1.26 13.92,37.06 14.2,36.78 14.2,36.56 RM68.1 14.61,35.98 RM69.2 RM49.1
RXD0/RXDLY: length 4.3
  TOP w0.114: RM77.2 RM87.1 12.78,35.18 RM76.1 12.78,36.37 13.09,36.67 13.09,36.79 13.48,37.19 13.48,37.2 13.52,37.24 UM1.25
RXD1/TXDLY: length 4.3
  TOP w0.114: UM1.24 13.12,37.34 12.57,36.8 v1(12.57,36.7)
  BOTTOM w0.114: v1(12.57,36.7) 12.78,36.49 RM74.1 12.7,35.98 RM86.1 RM75.2
RXD2/PLLOFF: length 4.2
  TOP w0.114: RM73.2 RM85.1 11.81,35.98 RM72.1 11.73,36.2 12.07,36.54 12.07,36.82 12.72,37.47 UM1.23
RXD3/PHYAD0: length 4.1
  TOP w0.114: UM1.22 12.32,37.59 11.68,36.96 v1(11.68,36.7)
  BOTTOM w0.114: v1(11.68,36.7) 11.73,36.66 RM60.1 11.73,35.52 11.81,35.43 RM84.1 RM61.2
TXC: length 34.1
  TOP w0.114: UM1.20 10.8,38.59 9.88,37.67 9.88,33.93 13.72,30.1 13.72,27.48 17.97,23.23 17.97,22.41 17.78,22.23 16.64,22.23 16.38,22.48 v1(16.38,22.95)
  BOTTOM w0.114: v1(16.38,22.95) 16.55,23.11 17.02,23.11 17.16,23.26 17.16,24.52 17.27,24.64 17.5,24.64 17.62,24.52 17.62,23.23 17.73,23.11 17.96,23.11 18.07,23.23 18.07,24.52 18.19,24.64 18.42,24.64 18.53,24.52 18.53,22.97 18.65,22.86 19.81,22.86 19.98,22.69 CM20.2 20.07,22.14 20.07,21.46 19.94,21.34 RM38.1
TXCTL: length 32.3
  TOP w0.114: UM1.19 10.46,38.99 9.37,37.9 9.37,33.35 13.08,29.64 13.08,27.38 15.13,25.33 15.13,25.17 14.79,24.84 14.79,24.68 14.96,24.51 15.12,24.51 15.45,24.85 15.61,24.85 16.47,23.99 16.47,23.83 v1(16.38,23.74)
  BOTTOM w0.114: RM36.1 20.52,21.18 20.52,23.05 20.17,23.4 19.11,23.4 19,23.51 19,23.74 19.11,23.86 20.17,23.86 20.29,23.97 20.29,24.21 20.01,24.49 19.85,24.49 19.8,24.44 19.63,24.44 19.47,24.6 19.47,24.76 19.53,24.81 19.53,24.97 19.35,25.15 16.88,25.15 16.38,24.65 v1(16.38,23.74)
TXD0: length 33.2
  TOP w0.114: v1(14.39,25.15) 13.69,25.15 12.62,26.21 12.62,29.51 8.99,33.15 8.99,38.05 10.33,39.39 UM1.18
  BOTTOM w0.114: v1(14.39,25.15) 15.15,25.91 15.88,25.91 15.99,26.02 15.99,26.56 16.11,26.67 16.33,26.67 16.45,26.56 16.45,26.02 16.56,25.91 16.79,25.91 16.91,26.02 16.91,26.56 17.02,26.67 17.25,26.67 17.36,26.56 17.36,26.02 17.48,25.91 19.81,25.91 22.31,23.41 22.31,22.69 21.97,22.35 21.97,22.1 22.61,21.46 RM83.1
TXD1: length 32.4
  TOP w0.114: v1(14.39,24.35) 13.87,24.35 12.22,26.01 12.22,29.36 8.61,32.97 8.61,38.2 10.2,39.79 UM1.17
  BOTTOM w0.114: RM82.1 21.72,21.72 21.34,22.1 21.08,22.1 20.95,22.23 20.95,22.48 21.08,22.61 21.63,22.61 21.84,22.82 21.84,23.32 19.63,25.53 15.57,25.53 v1(14.39,24.35)
TXD2: length 25.1
  TOP w0.114: v1(16.51,21.59) 15.98,22.12 15.47,22.12 11.84,25.76 11.84,29.11 8.23,32.72 8.23,38.35 10.06,40.19 UM1.16
  BOTTOM w0.114: v1(16.51,21.59) 16.38,21.46 RM81.1
TXD3: length 27.5
  TOP w0.114: UM1.15 9.85,40.59 7.85,38.58 7.85,32.49 11.43,28.91 11.43,25.6 15.06,21.97 15.06,21.64 15.6,21.11 16.66,21.11 v1(17.14,21.59)
  BOTTOM w0.114: RM80.1 17.27,21.46 v1(17.14,21.59)
XTAL-OUT: length 5.2
  TOP w0.114: RM79.2 CM26.1 20.07,42.97 23.1,42.97 XM1.1
N15939562: length 3
  TOP w0.114: DM1.1 28.39,47.31 v1(28.45,47.37)
  BOTTOM w0.114: RM41.1 27.73,47.37 RM43.2 28.36,47.29 v1(28.45,47.37)
N15939566: length 3
  TOP w0.114: v1(28.45,57.28) 28.39,57.22 DM3.1
  BOTTOM w0.114: v1(28.45,57.28) 28.36,57.19 RM55.2 27.73,57.28 RM53.1
N15939570: length 3
  TOP w0.114: v1(28.45,52.32) 28.39,52.26 DM2.1
  BOTTOM w0.114: RM46.1 27.73,52.32 RM48.2 28.36,52.24 v1(28.45,52.32)
N15939594: length 2.8
  TOP w0.114: DM1.2 28.25,49.21 28.32,49.28 v1(28.45,49.28)
  BOTTOM w0.114: v1(28.45,49.28) RM42.1 RM45.1
N15939682: length 2.8
  TOP w0.114: v1(28.45,54.23) 28.32,54.23 28.25,54.16 DM2.2
  BOTTOM w0.114: RM50.1 RM47.1 v1(28.45,54.23)
N15939752: length 2.8
  TOP w0.114: DM3.2 28.25,59.12 28.32,59.18 v1(28.45,59.18)
  BOTTOM w0.114: v1(28.45,59.18) RM54.1 RM57.1
N15990976: length 3.7
  TOP w0.114: JM1.9 10.92,50.19 CM10.2
N15993536: length 3
  TOP w0.381: RM26.1 v1(19.81,45.72) ; RM27.1 v1(21.08,45.72)
  BOTTOM w0.381: RM27.1 v1(21.08,45.72) v1(19.81,45.72)
N15993596: length 3.4
  TOP w0.381: RM28.1 17.4,45.97 v1(17.14,45.72) ; RM29.1 v1(18.67,45.72)
  BOTTOM w0.381: RM29.1 v1(18.67,45.72) v1(17.14,45.72)
N15993624: length 4
  TOP w0.381: RM30.1 14.43,46.31 v1(14.35,46.23) ; RM32.1 v1(16.26,45.72)
  BOTTOM w0.381: v1(14.35,46.23) 14.86,45.72 v1(16.26,45.72) RM32.1
N15993644: length 3
  TOP w0.381: RM37.1 v1(13.34,45.72) ; RM35.1 v1(12.06,45.72)
  BOTTOM w0.381: v1(13.34,45.72) v1(12.06,45.72) RM35.1

## Copper pours and planes (outline as drawn; the poured copper is in the pictures)
AVDD10 on TOP: 18.92,30.35 19.3,30.35 19.43,30.23 19.43,30.1 20.07,29.46 20.07,29.08 19.94,28.96 18.54,28.96 18.41,29.08 18.41,29.34 18.8,29.72 18.8,30.23
AVDD10 on BOTTOM: 16.76,43.69 11.68,43.69 11.05,44.32 9.91,44.32 8.45,42.86 7.68,42.86 2.92,38.1 2.92,33.02 7.37,28.57 19.94,28.57 20.07,28.7 20.07,29.46 19.81,29.72 8.51,29.72 4.7,33.53 4.7,37.08 10.67,43.05 10.92,43.05 11.18,42.8 15.62,42.8 15.88,43.05 16.76,43.05 16.89,43.18 16.89,43.56
DVDD33 on TOP: 20.19,31.5 20.19,37.47 19.94,37.72 19.94,38.61 20.07,38.73 20.95,38.73 21.08,38.61 21.08,33.53 21.34,33.27 21.34,32.38 21.46,32.26 22.48,32.26 22.61,32.13 22.61,31.37 22.48,31.24 21.59,31.24 21.34,30.99 20.7,30.99
DVDDRG on TOP: 21.21,30.73 21.34,30.61 21.34,29.97 21.21,29.84 19.94,29.84 19.81,29.97 19.81,30.73 19.94,30.86 20.32,30.86 20.45,30.73
DVDDRG on BOTTOM: 8.89,37.08 9.53,37.72 14.73,37.72 14.99,37.47 14.99,37.21 14.86,37.08 11.68,37.08 11.18,36.58 10.16,36.58 9.65,36.07 9.65,35.56 10.67,34.54 11.05,34.54 11.18,34.42 11.18,33.4 13.08,31.5 19.68,31.5 20.32,30.86 20.32,29.97 20.19,29.84 20.07,29.84 19.43,30.48 12.7,30.48 8.89,34.29
GND on TOP: 1.91,0.51 0.51,1.91 0.51,61.47 2.03,62.99 5.59,62.99 5.84,62.74 5.84,54.23 6.1,53.98 11.43,53.98 12.06,54.61 25.78,54.61 26.04,54.86 26.04,62.36 26.67,62.99 29.84,62.99 31.24,61.59 31.24,1.91 29.84,0.51 ; 2 cut-outs
GND on BOTTOM: 1.78,0.51 0.51,1.78 0.51,61.59 1.91,62.99 5.59,62.99 5.84,62.74 5.84,54.61 5.97,54.48 25.4,54.48 25.53,54.61 25.53,59.69 26.04,60.2 26.04,62.74 26.29,62.99 29.97,62.99 31.24,61.72 31.24,1.91 29.84,0.51 ; 1 cut-out
VCC-3V3-DEV on TOP: 22.86,30.73 22.86,28.57 21.72,27.43 18.29,27.43 18.16,27.56 18.16,28.19 18.29,28.32 20.19,28.32 21.72,29.84 21.72,30.73 21.84,30.86 22.73,30.86
VCC-3V3-DEV on BOTTOM: 7.24,16.89 6.48,16.89 6.48,18.03 5.46,19.05 5.46,21.84 7.62,24 7.62,28.07 7.87,28.32 19.18,28.32 19.3,28.19 19.3,27.43 19.18,27.3 10.03,27.3 9.27,26.54 9.27,22.61 7.49,20.83 7.49,18.92 7.24,18.67
VCC-3V3-DEV-IO on TOP: 6.22,35.69 4.7,35.69 4.57,35.56 4.57,30.99 8.13,27.43 8.13,24.77 8.26,24.64 9.91,24.64 10.16,24.89 10.16,28.07 6.35,31.88 6.35,35.56
VCC-3V3-DEV-IO on BOTTOM: 8.38,35.43 8.26,35.56 7.37,35.56 7.11,35.81 5.97,35.81 5.84,35.69 5.84,33.91 6.1,33.66 8.26,33.66 8.38,33.78
VCC-3V3-DEV-IO on BOTTOM: 8,16.89 8.26,16.89 8.26,18.03 8.38,18.16 9.4,18.16 10.03,18.8 10.03,20.57 11.3,21.84 11.3,26.92 11.18,27.05 10.16,27.05 9.53,26.42 9.53,22.48 8.64,21.59 8.64,19.3 8,18.67
REGOUT on TOP: 15.37,38.23 15.37,37.72 15.49,37.59 15.75,37.59 17.14,36.2 17.14,34.04 17.27,33.91 18.29,33.91 18.41,34.04 18.41,34.54 18.29,34.67 18.29,36.83 18.41,36.96 18.41,37.59 18.29,37.72 17.91,37.72 17.65,37.47 16.76,37.47 15.88,38.35 15.49,38.35
N15943518 on TOP: 18.92,36.83 19.81,36.83 19.94,36.7 19.94,31.24 19.3,30.61 18.03,30.61 17.91,30.73 17.91,31.11 18.03,31.24 18.54,31.24 18.67,31.37 18.67,34.42 18.8,34.54 18.8,36.7
GND on GND02: 2.02,0.47 0.81,0.94 0.5,2.2 0.51,2.25 0.51,58.71 0.51,58.74 0.94,60.02 2.22,60.45 2.25,60.45 29.5,60.45 29.53,60.45 30.81,60.02 31.24,58.74 31.24,58.71 31.24,2.25 31.24,2.22 30.81,0.94 29.53,0.51 29.5,0.51 2.05,0.51
GND on GND03: 2.02,0.47 0.81,0.94 0.5,2.2 0.51,2.25 0.51,61.25 0.51,61.28 0.94,62.56 2.22,62.99 2.25,62.99 29.5,62.99 29.53,62.99 30.81,62.56 31.24,61.28 31.24,61.25 31.24,2.25 31.24,2.22 30.81,0.94 29.53,0.51 29.5,0.51 2.05,0.51

## Text on the board
BOTTOM: ARTWORK BOTTOM
Board Geometry/Soldermask Bottom: SOLDERMASK BOTTOM
Package Geometry/Pastemask Bottom: PASTEMASK BOTTOM
Ref Des/Silkscreen Bottom: SILKSCREEN BOTTOM
TOP: ARTWORK TOP
Board Geometry/Soldermask Top: SOLDERMASK TOP
Package Geometry/Pastemask Top: PASTEMASK TOP
Ref Des/Silkscreen Top: SUB_RTL8211_GPHY_V1.0 | 2023-04-26 | SILKSCREEN TOP
GND02: ARTWORK LAYER02
GND03: ARTWORK LAYER03
DIMENSION: FAB DRAWING | FIGURE | SIZE | 8.0 | 25.59 | 35.04 | 62.99 | 125.98 | 23.62 | 127.95 | DRILL CHART: TOP to BOTTOM | ALL UNITS ARE IN MILS | PLATED | NON-PLATED | QTY | 581 | 2 | 10
